# Altium PCB Copy of PCB_FinalResult.PcbDoc
Units mm, origin at the board's own origin, x right, y up, seen from the top; angles counter-clockwise.
Board outline 96.14 x 51.12 mm, 2 copper layers (Top Layer, Bottom Layer); 61 components, 39 nets, 231 pads, 106 vias.
Unrouted connection lines stored in the file: 1.
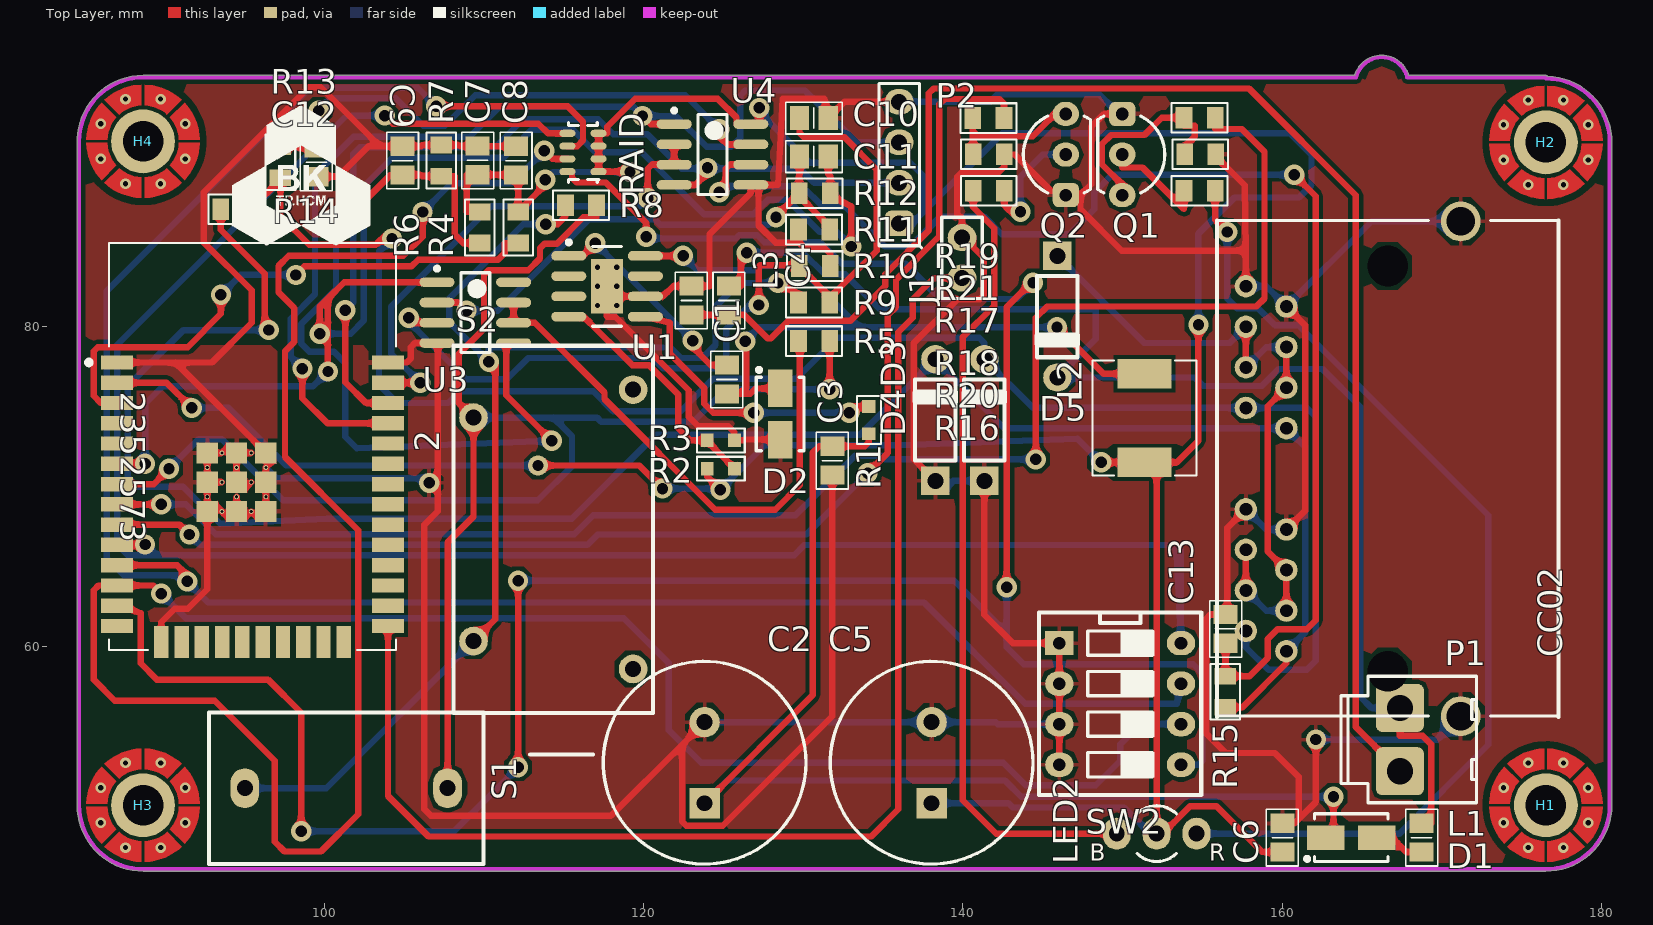
[diagram p0: Top Layer view]
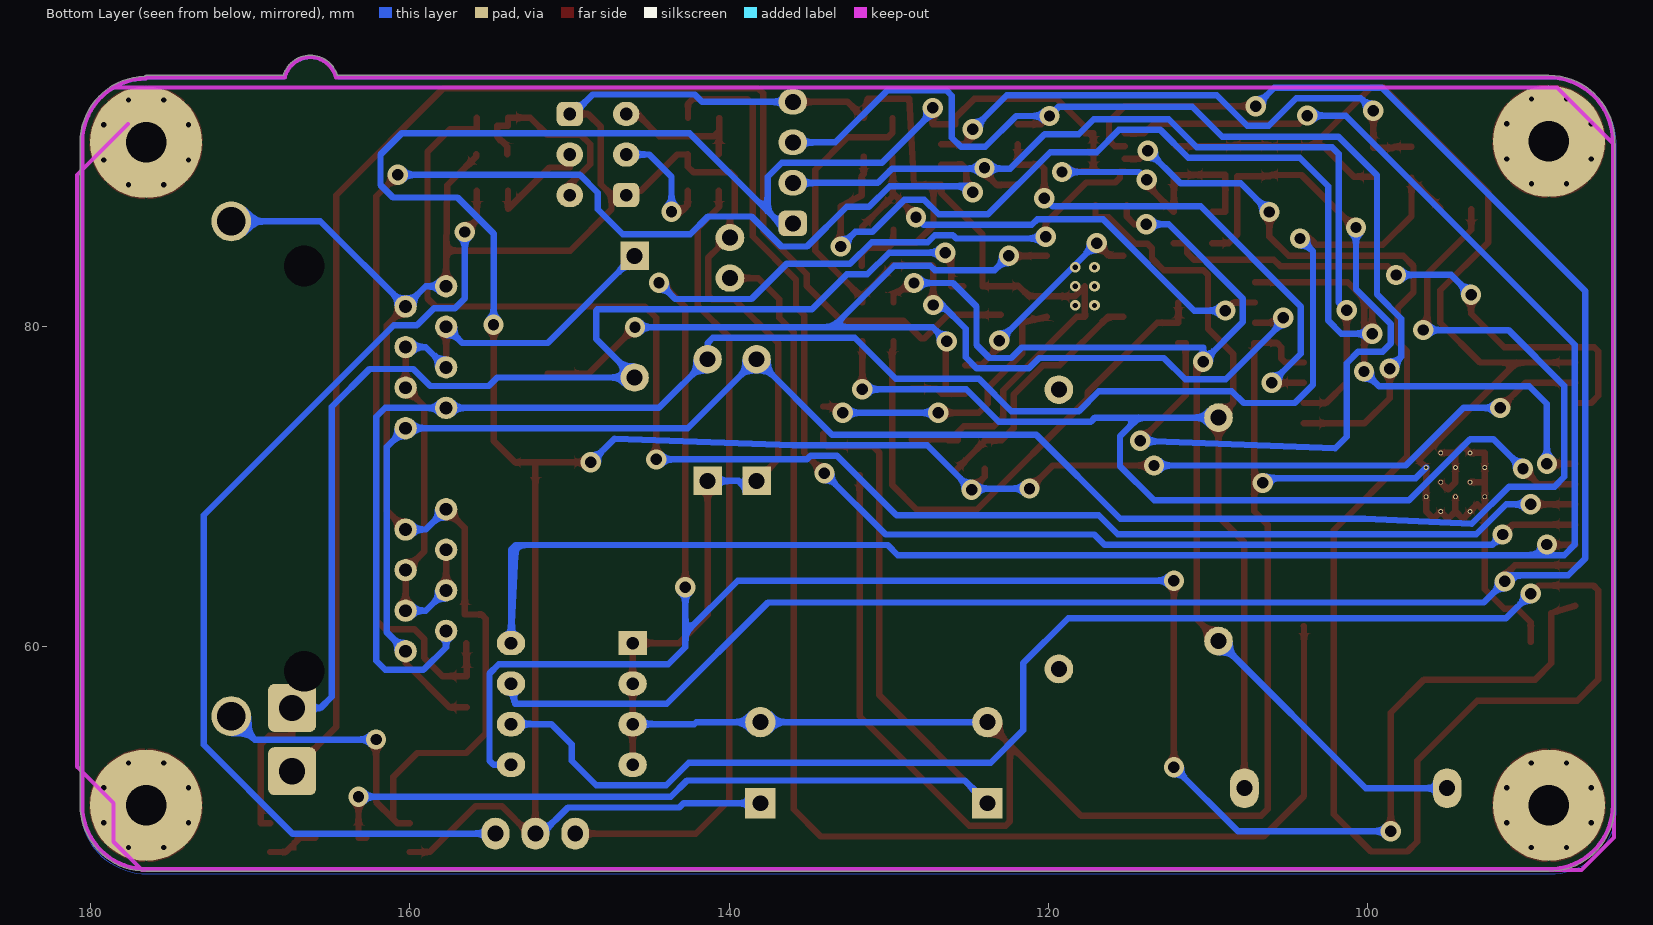
[diagram p1: Bottom Layer view, seen from below]

## Layer stack, top to bottom
Top Solder: solder mask 0.0102, Solder Resist, Dk 3.5
Top Layer: signal copper 0.0356
Dielectric 1: dielectric 0.32, FR-4, Dk 4.8
Bottom Layer: signal copper 0.0356
Bottom Solder: solder mask 0.0102, Solder Resist, Dk 3.5

## Board outline
84.519,50.033 ccw(c88.646,50.038) 88.646,45.911 176.53,45.911 ccw(c176.53,50.038) 180.657,50.038 180.657,91.567 ccw(c176.53,91.567) 176.641,95.693 ccw(c176.53,95.631) 176.53,95.758 167.941,95.758 ccw(c166.243,95.258) 164.545,95.758 88.646,95.758 ccw(c88.646,91.631) 84.522,91.79 84.519,91.762

## Design rules (kind name [scope] priority, off if disabled: settings)
Clearance Clearance_1 [InNamedPolygon('GND_L01_P000')] p1: gap=0.254 ignorepadtopadclearanceinfootprint=FALSE
Clearance [All] p2: gap=0.254 ignorepadtopadclearanceinfootprint=FALSE except(0: Arc-Hole Track-Hole SMDPad-Hole THPad-Hole Via-Hole Fill-Hole Poly-Hole Region-Hole Text-Hole)
ComponentClearance [InComponent('H*') OR InComponent('S1')] p1: gap=0 collisioncheckmode=3 verticalgap=0 showdistances=FALSE
Height [All] p1: minheight=0 maxheight=30 prefheight=12.7
MinimumSolderMaskSliver [IsText] p1: minsoldermaskwidth=0.254
PasteMaskExpansion [All] p1: expansion=0.254 thpadusetoppaste=TRUE thpadusebottompaste=TRUE
PolygonConnect [All] p1: connectstyle=Relief reliefconductorwidth=0.254 reliefentries=4 polygonreliefangle="90 Angle" airgapwidth=0.254
RoutingVias [All] p1: holewidth=0.711 width=1.27 viastyle="Through Hole" minholewidth=0.711 minwidth=1.27 maxholewidth=0.711 maxwidth=1.27
SilkToSilkClearance [IsText] p1: silktosilkclearance=0.254
SilkToSolderMaskClearance [IsText] p1: minsilkscreentomaskgap=0.254 clearancetoexposedcopper=TRUE
SolderMaskExpansion [All] p1: expansion=0.127 istentingtop=FALSE soldermaskfromhole=TRUE
UnpouredPolygon [All] p1: allowunpoured=TRUE allowshelved=TRUE
Width [All] p1: maxlimit=2 minlimit=0.2 preferedwidth=0.4 minimp=50.000000 maximp=50.000000 favimp=50.000000
23 further rules are at their usual default settings.

## Classes and differential pairs
component class "Slide Switch with an MCU": RAID SW2
component class RS-485: C12 C13 D3 D4 D5 R13 R14 R15 U4
component class "High-currenr LEDs": LED2 Q1 Q2 R16 R17 R18 R19 R20 R21
component class "ESP32_WROM_32 part": 2 C7 C8 J1 P2 R4
component class "Current sensor circuit": C9 C10 C11 R5 R6 R7 R8 R9 R10 R11 R12 S1 S2 U3
component class "3.3V regulator IC TPS5430": C1 C2 C3 C4 C5 C6 D1 D2 H2 H3 H4 L1 L2 L3 P1 R1 R2 R3 U1

## Components (designator, comment, footprint, x,y, rotation, side; value= is the part's Value field where it differs from the comment)
2 "ESP32-WROOM-32" MODULE_ESP32-WROOM-32 95.504,72.517 r0 top (schematic designator U2)
C1 "10nF" "C 0805" 125.222,76.708 r270 top
C2 "100uF/35V" CYL/D.500/LS.200 123.825,52.705 r90 top
C3 "0.1uF" "C 0805" 131.826,71.628 r270 top
C4 "1uF" "C 0805" 125.349,81.661 r270 top
C5 "220uF/16V" CYL/D.500/LS.200 138.049,52.705 r90 top
C6 "0.1uF" "C 0805" 160.02,48.006 r90 top
C7 "0.1uF" "C 0805" 109.607,90.435 r90 top
C8 "22uF" "C 0805" 112.014,90.424 r90 top
C9 "1uF" "C 0805" 104.902,90.424 r90 top
C10 "100pF" "C 0805" 130.672,93.091 r0 top
C11 "100pF" "C 0805" 130.672,90.678 r0 top
C12 "N/A" "C 0805" 99.504,90.317 r90 top
C13 "N/A" "C 0805" 156.464,61.087 r90 top
CN3 "RJ45 x2" CONN/RJ45/x2 166.624,71.12 r90 top
D1 "SS34" "DO-214AC (SMA)" 164.338,48.006 r180 top
D2 "SS34" "DO-214AC (SMA)" 128.558,74.549 r90 top
D3 "" DO-41 141.351,70.358 r90 top
D4 "" DO-41 138.282,70.358 r90 top
D5 "SS14" DO-41 145.923,84.455 r270 top
H1 "Screw Hole" SCREW/3.2/7.0/M 176.53,50.038 r0 top
H2 "Screw Hole" SCREW/3.2/7.0/M 176.53,91.567 r0 top
H3 "Screw Hole" SCREW/3.2/7.0/M 88.646,50.038 r0 top
H4 "Screw Hole" SCREW/3.2/7.0/M 88.646,91.631 r0 top
J1 "JUMP 2" JUMP/2/Close 139.954,85.598 r270 top
L1 "FB" "L 0805 (2012)" 168.742,48.006 r270 top
L2 "15uH" IND_SRP6540-150M 151.384,74.295 r270 top
L3 "FB" "L 0805 (2012)" 122.995,81.661 r90 top
LED2 "RB LED" LED-BICOLOR-3MM 154.646,48.26 r270 top
P1 "Header 2" HDR/Header/2/VH 167.386,54.154 r270 top
P2 "Header 4" HDR/Header/4 136.017,90.297 r90 top
Q1 "MMBT3904LT1G" TO-92/W100 149.99,90.805 r270 top
Q2 "MMBT3904LT1G" TO-92/W100 146.459,90.805 r90 top
R1 "N/A" "R 0603" 134.112,74.168 r90 top
R2 "10.0k" "R 0603" 124.841,71.12 r180 top
R3 "5.9k" "R 0603" 124.841,72.898 r180 top
R4 "10k" "R 0805" 112.141,86.233 r90 top
R5 "1k" "R 0805" 130.683,79.121 r0 top
R6 "1k" "R 0805" 109.735,86.233 r90 top
R7 "1k" "R 0805" 107.315,90.424 r270 top
R8 "100" "R 0805" 116.078,87.63 r0 top
R9 "1k" "R 0805" 130.683,81.534 r180 top
R10 "1k" "R 0805" 130.724,83.82 r180 top
R11 "1k" "R 0805" 130.683,86.106 r0 top
R12 "1k" "R 0805" 130.724,88.392 r0 top
R13 "10" "R 0805" 97.255,90.318 r270 top
R14 "120" "R 0805" 94.488,87.376 r0 top
R15 "10" "R 0805" 156.446,57.15 r270 top
R16 "330" "R 0805" 154.834,88.54 r0 top
R17 "330" "R 0805" 141.626,88.54 r180 top
R18 "4.7k" "R 0805" 154.834,93.112 r0 top
R19 "4.7k" "R 0805" 141.605,93.091 r0 top
R20 "47k" "R 0805" 154.875,90.826 r180 top
R21 "47k" "R 0805" 141.626,90.826 r180 top
RAID "10k" "RA4 1206 (3216)" 116.205,90.932 r180 top
S1 "TA12" TA12 101.373,51.105 r180 top
S2 "TA17" TA17 114.347,67.325 r270 top
SW2 "SW DIP-4" SW/DIP4 146.05,60.198 r270 top
U1 "TPS5430" "SOIC-8 EP" 117.716,82.55 r0 top
U3 "LM358" SOIC-8 109.461,80.899 r0 top
U4 "MAX485" SOIC-8 124.32,90.805 r0 top

## Footprints (in the part's own frame and the unit in brackets; to place one, negate y for a bottom-side part, rotate by r counter-clockwise, add the part's x,y. Pads: shape width x height; smd on the part's side, far side on the other; paste and mask are expansions set on the pad)
"C 0805" [mm] "Chip Capacitor, 2-Leads, Body 2.0x1.3mm, IPC Medium Density"
  rect 1.2x1.5 smd: 1(-0.9,0) 2(0.9,0)
  silkscreen extent -1.78,-1 1.78,1, body extent -1,-0.64 1,0.61, height 0.6
CONN/RJ45/x2 [mm]
  round 1.4 hole 0.8: 1(-11.43,6.35) 2(-10.16,8.89) 3(-8.89,6.35) 4(-7.62,8.89) 5(-6.35,6.35) 6(-5.08,8.89) 7(-3.81,6.35) 8(-2.54,8.89) 11(2.54,6.35) 12(3.81,8.89) 13(5.08,6.35) 14(6.35,8.89) 15(7.62,6.35) 16(8.89,8.89) 17(10.16,6.35) 18(11.43,8.89)
  round 2.5 hole 1.8: 9(-15.5,-4.57) 10(15.5,-4.57)
  round 0 hole 2.54 unplated: HOLE(-12.7,0) HOLE(12.7,0)
  silkscreen extent -15.56,-10.7 15.56,10.7, body extent -15.5,-10.7 15.56,10.7, height 13.46
CYL/D.500/LS.200 [mil]
  rect 75x75 hole 39: 1(-100,0)
  round 75 hole 39: 2(100,0)
  silkscreen extent -250,-250 250,250, body extent -256,-255 254,255, height 866
DO-41 [mil]
  rect 70x70 hole 39.37: 1(0,0)
  round 70 hole 39.37: 2(300,0)
  silkscreen extent 50,-55 250,55, body extent -15,-47 315,47, height 99
"DO-214AC (SMA)" [mm] "Molded Diode, 2-Leads, Body 4.3x2.7mm, IPC Medium Density"
  rect 2.35x1.55 smd: 1(-1.6,0) 2(1.6,0)
  silkscreen extent -2.3,-1.5 2.89,1.5, body extent -2.6,-1.3 2.6,1.3, height 2.4
HDR/Header/2/VH [mm]
  rrect25% 3x3 hole 1.65: 1(-1.98,0) 2(1.98,0)
  silkscreen extent -3.96,-3.7 3.96,4.8, body extent -3.93,-3.7 3.93,4.8, height 10.6
HDR/Header/4 [mm]
  rrect50% 1.6x1.8 hole 1: 1(-3.81,0)
  oval 1.6x1.8 hole 1: 2(-1.27,0) 3(1.27,0) 4(3.81,0)
  silkscreen extent -5.33,-1.4 4.95,1.27, body extent -5.08,-1.27 5.08,1.27, height 8.89
IND_SRP6540-150M [mm]
  rect 1.85x3.4 smd: 1(-2.775,0) 2(2.775,0)
  silkscreen extent -3.6,-3.25 3.6,3.25
JUMP/2/Close [mm]
  oval 1.7x1.8 hole 1: 1(0,0) 2(2.54,0)
  silkscreen extent -1.27,-1.27 3.81,1.27, body extent -1.27,-1.27 3.81,1.27, height 8.89
"L 0805 (2012)" [mm] "Chip Capacitor, 2-Leads, Body 2.0x1.3mm, IPC Medium Density"
  rect 1.2x1.5 smd: 1(-0.9,0) 2(0.9,0)
  silkscreen extent -1.78,-1 1.78,1, body extent -1,-0.6 1,0.6, height 0.95
LED-BICOLOR-3MM [mm] "Diode, Axial; Body 5.2 x 2.7 mm (LxDia. max), Lead Dia. 0.86 mm (max)"
  oval 2x1.75 hole 1: 1(0,0) 2(0,-2.5) 3(0,-5)
  silkscreen extent -1.75,-3.74 1.75,-1.26, body extent -2.02,-5.29 2.02,0.29, height 6.76
MODULE_ESP32-WROOM-32 [mm]
  rect 2x0.9 smd: 1(-8.5,5.26) 2(-8.5,3.99) 3(-8.5,2.72) 4(-8.5,1.45) 5(-8.5,0.18) 6(-8.5,-1.09) 7(-8.5,-2.36) 8(-8.5,-3.63) 9(-8.5,-4.9) 10(-8.5,-6.17) 11(-8.5,-7.44) 12(-8.5,-8.71) 13(-8.5,-9.98) 14(-8.5,-11.25) 25(8.5,-11.25) 26(8.5,-9.98) 27(8.5,-8.71) 28(8.5,-7.44) 29(8.5,-6.17) 30(8.5,-4.9) 31(8.5,-3.63) 32(8.5,-2.36) 33(8.5,-1.09) 34(8.5,0.18) 35(8.5,1.45) 36(8.5,2.72) 37(8.5,3.99) 38(8.5,5.26)
  rect 0.9x2 smd: 15(-5.715,-12.25) 16(-4.445,-12.25) 17(-3.175,-12.25) 18(-1.905,-12.25) 19(-0.635,-12.25) 20(0.635,-12.25) 21(1.905,-12.25) 22(3.175,-12.25) 23(4.445,-12.25) 24(5.715,-12.25)
  rect 1.33x1.33 smd: 39(-2.835,-4.075) 39(-2.835,-2.24) 39(-2.835,-0.405) 39(-1,-4.075) 39(-1,-2.24) 39(-1,-0.405) 39(0.835,-4.075) 39(0.835,-2.24) 39(0.835,-0.405)
  round 0.3 hole 0.2: 39(-2.835,-3.158) 39(-2.835,-1.323) 39(-1.917,-4.075) 39(-1.917,-2.24) 39(-1.917,-0.405) 39(-1,-3.158) 39(-1,-1.323) 39(-0.082,-4.075) 39(-0.082,-2.24) 39(-0.082,-0.405) 39(0.835,-3.158) 39(0.835,-1.323)
  Top Layer pour cut-out: -9.017,12.827 -9.017,6.35 9.017,6.35 9.017,12.827
  Bottom Layer pour cut-out: -9.017,12.827 -9.017,6.35 9.017,6.35 9.017,12.827
  silkscreen extent -10.4,-12.75 9,12.75, body extent -9,-12.75 9,12.75, height 2.91
"R 0603" [mm] "Chip Resistor, 2-Leads, Body 1.6x0.8mm, IPC Medium Density"
  rect 0.8x0.85 smd: 1(-0.85,0) 2(0.85,0)
  silkscreen extent -1.5,-0.75 1.5,0.75, body extent -0.8,-0.4 0.8,0.4, height 0.5
"R 0805" [mm] "Chip Resistor, 2-Leads, Body 2.0x1.3mm, IPC Medium Density"
  rect 1.05x1.35 smd: 1(-0.975,0) 2(0.975,0)
  silkscreen extent -1.75,-0.93 1.75,0.93, body extent -1,-0.61 1,0.59, height 0.5
"RA4 1206 (3216)" [mm] "Resistor Array x4 1206 (4D03)"
  oval 1x0.45 smd: 1(-0.975,1.2) 2(-0.975,0.4) 3(-0.975,-0.4) 4(-0.975,-1.2) 5(0.975,-1.2) 6(0.975,-0.4) 7(0.975,0.4) 8(0.975,1.2)
  silkscreen extent -0.99,-1.87 0.9,1.87, body extent -0.8,-1.6 0.8,1.6, height 0.5
SCREW/3.2/7.0/M [mm]
  round 4 / inner round 7 / far side round 7 hole 2.54: 1(0,0)
  Top Layer region: -2.25,0.1 -2.225,0.325 -2.175,0.575 -2.1,0.8 -2.025,0.975 -1.95,1.125 -1.875,1.25 -1.775,1.375 -1.675,1.5 -2.6,2.425 -2.775,2.225 -2.925,2.025 -3.05,1.825 -3.175,1.6 -3.275,1.375 -3.35,1.175 -3.425,0.95 -3.475,0.725 -3.5,0.6 -3.525,0.45 -3.55,0.1
  Top Layer region: -2.25,-0.1 -2.225,-0.325 -2.175,-0.575 -2.1,-0.8 -2.025,-0.975 -1.95,-1.125 -1.875,-1.25 -1.775,-1.375 -1.675,-1.5 -2.6,-2.425 -2.775,-2.225 -2.925,-2.025 -3.05,-1.825 -3.175,-1.6 -3.275,-1.375 -3.35,-1.175 -3.425,-0.95 -3.475,-0.725 -3.5,-0.6 -3.525,-0.45 -3.55,-0.1
  Top Layer region: -0.1,2.25 -0.325,2.225 -0.575,2.175 -0.8,2.1 -0.975,2.025 -1.125,1.95 -1.25,1.875 -1.375,1.775 -1.5,1.675 -2.425,2.6 -2.225,2.775 -2.025,2.925 -1.825,3.05 -1.6,3.175 -1.375,3.275 -1.175,3.35 -0.95,3.425 -0.725,3.475 -0.6,3.5 -0.45,3.525 -0.1,3.55
  Top Layer region: 0.1,2.25 0.325,2.225 0.575,2.175 0.8,2.1 0.975,2.025 1.125,1.95 1.25,1.875 1.375,1.775 1.5,1.675 2.425,2.6 2.225,2.775 2.025,2.925 1.825,3.05 1.6,3.175 1.375,3.275 1.175,3.35 0.95,3.425 0.725,3.475 0.6,3.5 0.45,3.525 0.1,3.55
  Top Layer region: 2.25,-0.1 2.225,-0.325 2.175,-0.575 2.1,-0.8 2.025,-0.975 1.95,-1.125 1.875,-1.25 1.775,-1.375 1.675,-1.5 2.6,-2.425 2.775,-2.225 2.925,-2.025 3.05,-1.825 3.175,-1.6 3.275,-1.375 3.35,-1.175 3.425,-0.95 3.475,-0.725 3.5,-0.6 3.525,-0.45 3.55,-0.1
  Top Layer region: 2.25,0.1 2.225,0.325 2.175,0.575 2.1,0.8 2.025,0.975 1.95,1.125 1.875,1.25 1.775,1.375 1.675,1.5 2.6,2.425 2.775,2.225 2.925,2.025 3.05,1.825 3.175,1.6 3.275,1.375 3.35,1.175 3.425,0.95 3.475,0.725 3.5,0.6 3.525,0.45 3.55,0.1
  Top Layer region: 0.1,-2.25 0.325,-2.225 0.575,-2.175 0.8,-2.1 0.975,-2.025 1.125,-1.95 1.25,-1.875 1.375,-1.775 1.5,-1.675 2.425,-2.6 2.225,-2.775 2.025,-2.925 1.825,-3.05 1.6,-3.175 1.375,-3.275 1.175,-3.35 0.95,-3.425 0.725,-3.475 0.6,-3.5 0.45,-3.525 0.1,-3.55
  Top Layer region: -0.1,-2.25 -0.325,-2.225 -0.575,-2.175 -0.8,-2.1 -0.975,-2.025 -1.125,-1.95 -1.25,-1.875 -1.375,-1.775 -1.5,-1.675 -2.425,-2.6 -2.225,-2.775 -2.025,-2.925 -1.825,-3.05 -1.6,-3.175 -1.375,-3.275 -1.175,-3.35 -0.95,-3.425 -0.725,-3.475 -0.6,-3.5 -0.45,-3.525 -0.1,-3.55
  Top Layer pour cut-out: -4,0 -3.696,1.531 -2.828,2.828 -1.531,3.695 0,4 0,4 1.531,3.695 2.828,2.828 3.695,1.531 4,0 4,0 3.696,-1.531 2.828,-2.828 1.531,-3.696 0,-4 0,-4 -1.531,-3.696 -2.828,-2.828 -3.696,-1.531 -4,0
  Bottom Layer pour cut-out: -4,0 -3.696,1.531 -2.828,2.828 -1.531,3.695 0,4 0,4 1.531,3.695 2.828,2.828 3.695,1.531 4,0 4,0 3.696,-1.531 2.828,-2.828 1.531,-3.696 0,-4 0,-4 -1.531,-3.696 -2.828,-2.828 -3.696,-1.531 -4,0
SOIC-8 [mm] "SOIC, 8-Leads, Body 5.0x4.0mm (max), Pitch 1.27mm, IPC Medium Density"
  oval 2.2x0.6 smd: 1(-2.4,1.905) 2(-2.4,0.635) 3(-2.4,-0.635) 4(-2.4,-1.905) 5(2.4,-1.905) 6(2.4,-0.635) 7(2.4,0.635) 8(2.4,1.905)
  silkscreen extent -2.52,-2.5 0.9,2.88, body extent -3,-2.49 3,2.41, height 1.75
"SOIC-8 EP" [mm] "SOIC, 8-Leads, Body 5.0x4.0mm (max), Pitch 1.27mm, IPC Medium Density"
  oval 2.2x0.6 smd: 1(-2.4,1.905) 2(-2.4,0.635) 3(-2.4,-0.635) 4(-2.4,-1.905) 5(2.4,-1.905) 6(2.4,-0.635) 7(2.4,0.635) 8(2.4,1.905)
  rect 2x3.4 smd: 9(0,0)
  silkscreen extent -2.52,-2.5 0.9,2.88, body extent -3,-2.49 3,2.41, height 1.75
SW/DIP4 [mil]
  rect 60x70 hole 31: 1(0,0)
  oval 60x70 hole 31: 2(100,0) 3(200,0) 4(300,0) 5(300,300) 6(200,300) 7(100,300) 8(0,300)
  silkscreen extent -75,-50 375,350, body extent -50,0 350,300, height 165
TA12 [mm]
  oval 1.8x2.5 hole 1: 1(-6.35,0) 2(6.35,0)
  silkscreen extent -8.6,-4.75 8.6,4.75, body extent -8.6,-4.75 8.6,4.75, height 20.4
TA17 [mm]
  round 1.8 hole 1: 1(-7,-5) 2(7,-5) 3(8.75,5) 4(-8.75,5)
  silkscreen extent -11.5,-6.25 11.5,6.25, body extent -11.5,-6.25 11.5,6.25, height 26
TO-92/W100 [mil]
  rrect50% 60x65 hole 31: 1(-100,0)
  oval 60x65 hole 31: 2(0,0) 3(100,0)
  silkscreen extent -95,-60 95,105, body extent -114,-60 112,105, height 370

## Part data
2: "Bluetooth, WiFi 802.11b/g/n, Bluetooth v4.2 + EDR, Class 1, 2 and 3 Transceiver Module 2.4GHz ~ 2.5GHz Integrated, Trace Surface Mount", PACKAGE="Module Espressif Systems", Availability=Unavailable, MF="Espressif Systems", MP=ESP32-WROOM-32D, Price=None, SnapEDA_Link=https://www.snapeda.com/parts/ESP32-WROOM-32D/Espressif%20Systems/view-part/2768115/?ref=snap
C1 C3 C4 C6 C7 C8 C9 C10 C11 C12 C13: library part "Capacitor NP", "Capacitor non-pol"
C2 C5: library part Capacitor, "Capacitor pol"
CN3: library part "CON RJ45 x2", "Connector RJ45 X2"
D1 D5: library part Diode, "Default Diode"
D2 D3 D4: library part "Diode Zener", "Zener Diode"
L1 L3: library part Inductor, "Inductor"
L2: library part SRP6540-150M, "15ÂµH Shielded Wirewound Inductor 2.9A 121mOhm Max Nonstandard", PACKAGE="Nonstandard Bourns", Check_prices=https://www.snapeda.com/parts/SRP6540-150M/Bourns/view-part/613418/?ref=eda, Digi-Key_Part_Number=SRP6540-150MCT-ND, MF=Bourns, MP=SRP6540-150M, Purchase-URL=https://pricing.snapeda.com/search/part/SRP6540-150M/?ref=eda, SnapEDA_Link=https://www.snapeda.com/parts/SRP6540-150M/Bourns/view-part/613418/?ref=snap
LED2: library part "LED 2-color-A", "Bicolor RB 3mm LED"
P1: "Header, 2-Pin"
P2: "Header, 4-Pin"
Q1 Q2: library part "Transistor NPN", "NPN Bipolar Transistor"
R1 R2 R3 R4 R5 R6 R7 R8 R9 R10 R11 R12 R13 R14 R15 R16 R17 R18 R19 R20 R21: library part Resistor, "Resistor"
RAID: library part "Resistor Array 4", "Resistor Array 4"
U1: library part TPS54xx, "3/5A, Wide input range, Step-down SWIFT DC-DC Converter"
U3: "Low Power Dual Operational Amplifiers"
U4: "Low-Power, Slew-Rate-Limited  RS-485/RS-422 Transceivers"
H1 H2 H3 H4: TYPE=NO-BOM, UNIT PRICE=0

## Via types
v1: diameter 1.27, hole 0.711, Top Layer to Bottom Layer, 68 vias
v2: diameter 0.66, hole 0.33, Top Layer to Bottom Layer, 38 vias

## Nets (pads, with @x,y where several pads share a name; then routed paths per layer and width w, separated by ;. In a path a pad name is that pad's centre, name@x,y a point inside that pad or via, vN(x,y) a via of type N, cw(c..) or ccw(c..) an arc to the next point about the centre after c; other vN are vias at no path point)
3V3: 2.2 C5.1 C6.1 C7.1 C8.1 L2.2 LED2.2 P2.1 R2.2 R4.2 R6.2 RAID.1 RAID.2 RAID.3 RAID.4 U4.8 | length 223.2
  Top Layer w0.4: 2.2 90.117,76.507 v1(91.694,74.93) ; R6.2 108.915,87.208 108.915,89.535 C7.1 110.795,89.535 110.806,89.524 C8.1 112.141,89.524 R4.2 113.843,88.91 v1(113.843,89.23) ; v1(113.386,71.323) 119.736,71.323 v1(121.183,69.875) ; v1(119.151,89.713) 119.132,89.732 RAID.1 RAID.2 RAID.3 RAID.4 117.716,92.132 117.716,92.545 119.478,94.307 124.638,94.307 125.82,93.125 125.82,92.71 U4.8 127.254,92.71 v1(127.254,93.726) ; R2.2 123.991,70.624 124.739,69.875 v1(124.816,69.799) ; v1(148.666,71.52) L2.2 L2.2@152.146,71.52 ; v1(154.762,80.137) 154.762,72.866 153.416,71.52 L2.2@152.146,71.52 ; C6.1 158.761,47.106 155.88,49.987 154.254,49.987 152.527,48.26 LED2.2 L2.2@152.146,71.52
  Bottom Layer w0.4: v1(91.694,74.93) 94,74.93 97.607,71.323 v1(113.386,71.323) ; v1(113.843,89.23) 114.325,89.713 v1(119.151,89.713) ; v1(121.183,69.875) v1@124.739,69.875 ; v1(124.816,69.799) 127.6,72.584 135.984,72.584 147.187,73 v1(148.666,71.52) ; v1(127.254,93.726) 127.254,93.472 130.429,90.297 136.703,90.297 137.592,89.408 137.592,87.249 ; P2.1 136.83,86.487 137.592,87.249 ; C5.1 142.862,50.165 143.129,49.898 150.101,49.898 151.74,48.26 LED2.2 ; v1(154.762,80.137) 154.762,85.852 157.023,88.113 161.061,88.113 161.849,88.9 161.849,90.805 160.528,92.126 142.469,92.126 137.592,87.249
"ADC1 CH6": 2.6 C11.2 R12.2 U3.1 | length 85.9
  Top Layer w0.4: 2.6 v1(88.773,71.427) ; v1(99.72,79.578) 99.72,81.28 100.228,81.788 ; v1(100.228,77.216) 100.228,81.788 ; U3.1 101.244,82.804 100.228,81.788 ; C11.2 131.572,89.586 131.699,89.459 R12.2 131.699,88.24 133.02,87.554 v1(133.02,85.039)
  Bottom Layer w0.4: v1(88.773,71.427) 88.773,75.184 89.872,76.283 99.295,76.283 v1(100.228,77.216) ; v1(99.72,79.578) 101.648,79.578 102.479,80.41 102.479,88.817 104.264,90.602 111.243,90.602 112.986,92.345 115.586,92.345 116.976,90.954 119.888,90.954 123.787,87.055 126.882,87.055 127.787,87.96 129.032,87.96 131.026,85.966 132.093,85.966 v1(133.02,85.039)
"ADC1 CH7": 2.7 R5.2 R8.2 S1.1 S2.1 | length 105.5
  Top Layer w0.4: 2.7 89.309,70.157 v1(90.272,71.12) ; S1.1 107.723,66.499 109.347,68.123 S2.1 108.433,75.239 108.433,78.308 110.007,79.883 110.007,83.279 110.287,83.558 112.776,83.558 113.513,84.295 113.513,84.938 113.792,85.217 114.579,85.217 116.23,86.868 117.053,86.868 R8.2 ; v1(131.658,76.095) R5.2
  Bottom Layer w0.4: v1(90.272,71.12) 92.118,72.966 93.587,72.966 97.411,69.142 113.376,69.142 115.515,71.28 115.515,73.152 114.342,74.325 ; S2.1 114.342,74.325 ; v1(131.658,76.095) 125.148,76.095 123.12,74.067 117.339,74.067 117.081,74.325 114.342,74.325
GND: 2.1 2.15 2.38 2.39 C2.2 C3.2 C5.2 C6.2 C7.2 C8.2 C9.2 C10.2 C12.1 C13.2 CN3.7 CN3.8 CN3.9 CN3.10 CN3.17 CN3.18 D2.1 D3.1 D4.1 J1.1 L3.2 P2.4 Q1.1 Q2.1 R3.1 R7.1 R10.1 R11.1 R20.1 R21.1 SW2.1 SW2.2 SW2.3 SW2.4 U1.6 U1.9 U3.4 U4.5 | length 440.4
  Top Layer w0.4: 2.1 90.674,77.777 ; 2.15 89.789,61.493 90.637,62.341 91.44,62.341 92.669,63.57 2.39@92.669,68.442 ; 2.39@93.587,70.277 2.39@92.669,70.277 ; 2.39@94.504,69.359 2.39@94.504,68.442 ; 2.39@95.422,70.277 94.963,69.818 94.504,70.277 94.504,71.194 2.39@94.504,72.112 ; 2.39@95.422,72.112 2.39@94.504,72.112 ; C12.1 100.861,89.417 102.768,91.324 103.48,91.324 ; 2.38 105.156,77.777 105.406,78.027 105.406,78.74 105.66,78.994 U3.4 107.112,78.994 107.112,70.764 ; v1(106.578,70.231) 107.112,70.764 ; C8.2 110.385,91.324 110.374,91.335 C7.2 108.471,91.335 108.407,91.399 R7.1 106.145,91.399 106.07,91.324 C9.2 103.48,91.324 ; C2.2 122.419,53.839 ; D2.1 126.335,72.949 126.284,72.898 R3.1 125.691,73.406 125.31,73.787 123.419,73.787 122.839,74.366 122.839,76.028 118.222,80.645 117.716,80.645 U1.9 118.351,81.915 U1.6 121.209,81.915 121.855,82.561 L3.2 124.13,82.561 124.13,85.802 126.72,88.392 U4.5 U4.5@127.205,88.9 ; R10.1 131.699,84.582 131.318,84.963 130.048,84.963 129.724,85.287 ; C3.2 131.826,55.617 124.968,48.759 122.682,48.759 122.419,49.022 122.419,53.839 ; P2.4 132.588,94.107 C10.2 131.318,94.31 128.718,94.31 128.422,88.9 U4.5@127.205,88.9 ; D4.1 136.931,71.708 136.931,78.994 139.675,81.737 141.072,81.737 141.308,81.974 141.308,84.353 140.665,84.996 140.665,85.598 J1.1 139.954,86.792 139.649,87.097 139.649,89.408 139.929,89.687 142.24,89.687 142.6,90.048 R21.1@142.6,90.805 ; D3.1 141.351,61.976 143.129,60.198 SW2.1 SW2.2 SW2.3 SW2.4 ; R21.1 R21.1@142.6,90.805 ; Q1.1 148.844,93.345 148.056,92.557 148.056,88.951 147.371,88.265 ; R20.1 155.85,90.678 157.655,88.873 157.734,84.785 ; CN3.8 156.566,67.412 156.566,61.987 C13.2 155.51,61.987 155.245,61.722 155.245,54.534 156.464,53.315 159.537,53.315 161.036,51.816 161.036,49.16 ; CN3.18 157.734,84.785 ; C6.2 160.782,48.906 161.036,49.16 ; CN3.7 161.442,68.478 161.442,80.112 CN3.17 ; v1(162.122,54.153) 162.122,50.246 161.036,49.16 ; 90.674,77.777 96.339,72.112 96.798,71.653 96.339,71.194 96.339,70.277 96.339,69.359 96.339,68.442 95.88,67.983 95.422,68.442 94.963,67.983 2.39@94.504,68.442 ; 90.674,77.777 92.966,77.777 95.453,80.264 95.453,82.296 92.456,85.293 92.456,88.443 99.035,95.021 99.782,95.021 103.48,91.324 ; 2.39@92.669,68.442 92.669,69.359 2.39@92.669,70.277 ; 2.39@92.669,68.442 93.128,68.901 93.587,68.442 94.045,67.983 2.39@94.504,68.442 ; 2.39@92.669,70.277 92.669,71.194 92.669,72.112 93.587,72.112 94.045,72.571 2.39@94.504,72.112 ; 107.112,70.764 107.112,68.453 106.274,67.615 106.274,49.784 106.68,49.378 117.958,49.378 122.419,53.839 ; U4.5@127.205,88.9 127.205,86.36 128.294,85.271 129.708,85.271 129.724,85.287 ; 129.724,85.287 R11.1 129.708,85.303 129.724,85.287 ; R21.1@142.6,90.805 143.256,90.805 145.542,88.519 Q2.1 147.371,88.265 ; 147.371,88.265 147.371,87.376 149.962,84.785 157.734,84.785
  Bottom Layer w0.4: 2.39@96.339,71.194 96.998,70.536 106.274,70.536 v1(106.578,70.231) ; C2.2 C5.2 142.062,55.245 142.189,55.118 SW2.3 ; P2.4 141.707,94.107 142.164,94.564 148.539,94.564 149.758,93.345 Q1.1 ; D4.1 138.848,69.792 139.414,70.358 D3.1 ; CN3.8 159.004,67.31 CN3.7 ; CN3.18 159.004,82.55 CN3.17 165.614,86.62 CN3.10 ; v1(162.122,54.153) 169.727,54.153 CN3.9
  other v2: 117.116,81.35 118.316,81.35 117.116,82.55 118.316,82.55 117.116,83.75 118.316,83.75
LED0: 2.8 R18.2 | length 97.8
  Top Layer w0.4: 2.8 v1(89.787,68.887) ; v1(144.577,71.704) 144.577,80.569 145.288,81.28 158.394,81.28 158.902,81.788 158.902,90.983 157.48,92.405 155.809,92.405 R18.2
  Bottom Layer w0.4: v1(89.787,68.887) 91.326,68.887 93.201,67.012 115.653,67.012 116.84,68.199 129.515,68.199 133.245,71.93 134.903,71.93 135.128,71.704 v1(144.577,71.704)
LED1: 2.9 R19.2 | length 79.6
  Top Layer w0.4: 2.9 90.932,67.617 v1(91.549,67) ; v1(134.036,70.841) 135.306,72.111 135.306,80.747 135.814,81.255 135.814,82.956 138.532,85.674 138.532,93.955 138.862,94.285 142.275,94.285 142.58,93.98 R19.2
  Bottom Layer w0.4: v1(91.549,67) 92.191,66.358 116.49,66.358 117.132,67 130.195,67 v1(134.036,70.841)
NetC1_1: C1.1 U1.1 | length 13.6
  Top Layer w0.4: U1.1 116.18,84.455 v1(116.98,85.255) ; v1(123.088,79.146) 123.088,78.74 124.22,77.608 C1.1
  Bottom Layer w0.4: v1(116.98,85.255) v1(123.088,79.146)
NetC1_2: C1.2 D2.2 L2.1 U1.8 | length 49
  Top Layer w0.4: U1.8 v1(122.479,84.455) ; C1.2 126.049,75.808 ; v1(126.365,79.096) 126.441,79.019 126.441,76.2 126.049,75.808 ; D2.2 127.036,76.149 126.695,75.808 126.049,75.808 ; v1(145.898,79.985) 148.812,77.07 L2.1
  Bottom Layer w0.4: v1(122.479,84.455) 123.368,83.566 127.127,83.566 127.406,83.845 129.659,83.845 133.52,79.985 ; v1(126.365,79.096) 127.254,79.985 133.52,79.985 ; v1(145.898,79.985) 133.52,79.985
NetC9_1: C9.1 R6.1 R7.2 U3.5 | length 51.3
  Top Layer w0.4: v1(100.736,86.233) 100.852,86.233 104.143,89.524 C9.1 106.07,89.524 106.145,89.449 R7.2 108.179,89.449 108.179,85.791 108.712,85.258 R6.1 ; U3.5 111.401,78.994 111.401,75.721 v1(114.249,72.873)
  Bottom Layer w0.4: v1(100.736,86.233) 100.736,82.372 98.552,80.188 98.552,78.969 99.06,78.461 100.584,78.461 101.317,77.727 101.317,73.13 102.035,72.412 114.249,72.869 v1(114.249,72.873)
NetC10_1: C10.1 R9.1 R10.2 U3.3 | length 53.6
  Top Layer w0.4: v1(105.283,80.586) 105.605,80.264 U3.3 ; v1(127.223,81.382) 127.223,83.786 127.296,83.859 129.749,83.859 R10.2 R9.1@131.707,81.862 ; C10.1 129.772,92.163 130.048,91.887 132.588,91.887 134.617,89.858 134.617,84.772 R9.1@131.707,81.862 ; R9.1@131.707,81.862 R9.1 131.658,81.813 R9.1@131.707,81.862
  Bottom Layer w0.4: v1(105.283,80.586) 105.156,80.459 108.899,76.716 111.435,76.716 112.776,78.057 120.583,78.057 121.237,77.403 124.482,77.403 125.185,78.106 125.185,79.895 126.672,81.382 v1(127.223,81.382)
NetC11_1: C11.1 R11.2 R12.1 U3.2 | length 31.6
  Top Layer w0.4: U3.2 108.407,81.534 v1(108.915,81.026) ; v1(128.295,86.868) 128.295,86.938 R12.1 ; C11.1 129.772,89.533 129.749,89.51 R12.1 ; R11.2 131.658,86.284 129.749,88.193 R12.1
  Bottom Layer w0.4: v1(108.915,81.026) 110.865,81.026 116.577,86.738 120.71,86.738 121.046,86.401 127.829,86.401 v1(128.295,86.868)
NetC12_2: C12.2 R13.1 U4.7 | length 35.2
  Top Layer w0.4: R13.1 98.323,91.292 98.399,91.217 C12.2 99.644,91.217 v1(99.644,93.548) ; v1(124.739,92.38) 124.739,91.948 125.247,91.44 U4.7
  Bottom Layer w0.4: v1(99.644,93.548) 100.428,94.332 104.473,94.332 106.201,92.605 107.549,92.605 109.453,94.509 122.61,94.509 v1(124.739,92.38)
NetC13_1: C13.1 R15.1 U4.6 | length 82.8
  Top Layer w0.4: v1(124.739,88.443) 125.146,88.849 125.146,89.916 125.4,90.17 U4.6 ; C13.1 156.464,59.149 156.446,59.131 R15.1 157.963,58.125 159.106,59.268 159.106,60.452 159.715,61.062 161.544,61.062 162.103,61.62 162.103,88.189 v1(160.757,89.535)
  Bottom Layer w0.4: v1(124.739,88.443) 125.12,88.824 129.946,88.824 131.242,87.528 132.639,87.528 135.128,85.039 136.728,85.039 138.608,86.919 141.326,86.919 142.443,85.801 146.66,85.801 148.234,87.376 148.234,88.417 149.352,89.535 v1(160.757,89.535)
NetD1_1: D1.1 L1.2 | length 3.2
  Top Layer w0.4: D1.1 166.878,48.006 167.778,47.106 L1.2
NetJ1_2: 2.25 J1.2 | length 80.4
  Top Layer w0.4: 2.25 103.988,61.267 103.988,50.622 106.528,48.082 134.264,48.082 135.966,49.784 135.966,79.68 136.855,80.569 136.855,81.737 138.176,83.058 J1.2
NetLED2_1: LED2.1 R16.2 | length 64
  Top Layer w0.4: R16.2 155.809,86.711 v1(156.566,85.954)
  Bottom Layer w0.4: LED2.1 167.361,48.26 172.923,53.823 172.923,68.199 161.011,80.112 159.563,80.112 158.496,81.178 157.175,81.178 156.566,81.788 v1(156.566,85.954)
NetLED2_3: LED2.3 R17.2 | length 50.1
  Top Layer w0.4: R17.2 140.651,87.505 141.962,86.194 141.962,81.333 140.005,79.376 140.005,50.343 142.088,48.26 LED2.3
NetQ1_1: Q1.3 R18.1 R20.2 | length 12.8
  Top Layer w0.4: Q1.3 149.99,88.925 148.71,90.205 148.71,91.44 149.295,92.024 151.384,92.024 152.471,93.112 R18.1 153.859,92.609 154.533,92.609 154.533,91.934 153.9,91.301 R20.2
NetQ1_3: Q1.2 R16.1 | length 6.9
  Top Layer w0.4: Q1.2 149.99,89.992 151.257,89.992 153.859,87.39 R16.1
NetQ2_1: Q2.3 R19.1 R21.2 | length 8.8
  Top Layer w0.4: R19.1 140.63,92.298 ; R21.2 140.651,91.949 140.63,91.97 140.63,92.298 ; Q2.3 145.76,93.345 144.374,91.958 140.97,91.958 140.63,92.298
NetQ2_3: Q2.2 R17.1 | length 7.7
  Top Layer w0.4: R17.1 142.6,87.625 143.002,87.224 v1(143.612,87.224)
  Bottom Layer w0.4: v1(143.612,87.224) 143.612,89.408 145.009,90.805 Q2.2
NetR1_2: R1.2 U1.5 | length 18.3
  Top Layer w0.4: U1.5 121.641,80.264 121.641,78.34 123.8,76.181 123.8,75.184 124.358,74.625 v1(126.898,74.625) ; v1(132.893,74.625) 133.286,75.018 R1.2
  Bottom Layer w0.4: v1(126.898,74.625) v1(132.893,74.625)
NetR2_1: R2.1 R3.2 U1.4 | length 15.6
  Top Layer w0.4: U1.4 116.256,80.645 119.304,77.597 120.345,77.597 122.185,75.757 122.185,73.649 122.936,72.898 R3.2 123.991,72.845 125.691,71.145 R2.1
NetR4_1: 2.3 R4.1 | length 34.9
  Top Layer w0.4: 2.3 86.004,75.237 85.547,75.694 85.547,78.486 85.801,78.74 91.44,78.74 93.523,80.823 v1(93.523,82.017) ; v1(98.222,83.261) 98.755,83.795 105.461,83.795 105.878,84.212 110.882,84.212 111.303,84.633 111.303,85.258 R4.1
  Bottom Layer w0.4: v1(93.523,82.017) 94.767,83.261 v1(98.222,83.261)
NetR5_1: R5.1 U3.6 U3.7 | length 34
  Top Layer w0.4: U3.7 U3.6 113.182,80.264 117.551,75.895 117.551,75.489 124.485,68.555 128.245,68.555 129.794,70.104 129.794,78.552 129.708,78.638 R5.1
NetR8_1: R8.1 R9.2 S1.2 S2.2 | length 76.1
  Top Layer w0.4: S2.2 110.719,61.697 110.719,77.419 v1(110.312,77.826) ; v1(113.868,86.436) 114.62,86.436 115.103,86.919 R8.1 ; v1(128.422,82.753) 129.708,82.067 R9.2
  Bottom Layer w0.4: S1.2 100.127,51.105 S2.2 ; v1(113.868,86.436) 112.471,86.436 107.823,81.788 107.823,80.315 v1(110.312,77.826) 110.312,78.715 121.666,78.715 122.323,78.057 123.698,78.057 124.511,78.87 124.511,81.28 125.984,82.753 v1(128.422,82.753)
PGND: C4.2 L3.1 P1.2 | length 94.2
  Top Layer w0.4: L3.1 124.155,80.761 C4.2 126.295,80.761 127.78,79.277 127.965,79.277 129.08,80.391 132.964,80.391 135.138,82.564 135.138,83.312 137.871,86.046 137.871,94.634 138.176,94.939 157.932,94.939 164.617,88.254 164.617,54.943 P1.2
RS485_5V: CN3.3 CN3.4 CN3.5 CN3.6 CN3.13 CN3.14 CN3.15 CN3.16 D5.1 | length 43.2
  Top Layer w0.4: CN3.4 CN3.6 ; CN3.14 CN3.16 ; CN3.3 CN3.5 159.106,65.938 159.106,75.032 CN3.13 CN3.15
  Bottom Layer w0.4: D5.1 151.378,79 156.724,79 CN3.16 ; CN3.4 159.004,62.23 CN3.3 ; CN3.14 159.004,78.74 CN3.15
RS485_A: CN3.1 CN3.11 D4.2 R14.1 R15.2 | length 125.2
  Top Layer w0.4: R14.1 93.513,86.09 96.266,83.337 96.266,80.061 v1(96.52,79.807) ; R15.2 157.521,56.175 160.274,58.928 CN3.1
  Bottom Layer w0.4: v1(96.52,79.807) 91.18,79.807 87.681,76.308 87.681,70.612 88.29,70.002 91.135,70.002 93.472,67.666 100.178,67.987 115.503,67.987 120.754,73.238 133.541,73.238 D4.2 142.6,73.66 CN3.11 161.442,72.492 161.442,60.858 CN3.1
RS485_B: CN3.2 CN3.12 D3.2 R13.2 R14.2 | length 108.4
  Top Layer w0.4: R14.2 95.463,87.452 R13.2@97.255,89.244 ; R13.2 R13.2@97.255,89.244 ; v1(104.242,85.547) 103.631,85.547 103.226,85.142 99.06,85.142 97.255,86.947 R13.2@97.255,89.244
  Bottom Layer w0.4: v1(104.242,85.547) 103.429,84.734 103.429,76.371 104.565,75.235 107.772,75.235 108.509,75.971 116.84,75.971 118.09,74.721 122.326,74.721 124.355,76.749 129.556,76.749 132.131,79.324 141.021,79.324 141.351,78.994 D3.2 144.399,74.93 CN3.12 161.544,74.93 162.103,74.371 162.103,59.08 161.544,58.522 159.156,58.522 157.734,59.944 CN3.2
RS485_EN: 2.37 U4.2 U4.3 | length 31.3
  Top Layer w0.4: 2.37 106.017,76.507 v1(106.02,76.505) ; v1(120.258,88.065) 120.258,89.916 120.512,90.17 U4.3 U4.2
  Bottom Layer w0.4: v1(106.02,76.505) 104.191,78.334 104.191,81.28 110.465,87.554 119.747,87.554 v1(120.258,88.065)
RXD0: 2.35 P2.3 U4.1 | length 66.9
  Top Layer w0.4: v1(98.628,77.394) 98.628,75.54 100.201,73.967 2.35 ; v1(119.939,93.218) 120.447,92.71 U4.1
  Bottom Layer w0.4: v1(98.628,77.394) 97.892,78.13 97.892,80.518 99.416,82.042 99.416,89.51 101.829,91.923 109.118,91.923 110.998,93.802 119.355,93.802 v1(119.939,93.218) 122.026,93.218 123.956,91.288 125.476,91.288 126.052,91.864 126.052,94.488 126.382,94.818 130.099,94.818 133.35,91.567 P2.3
SW1: 2.10 RAID.5 SW2.8 | length 129.2
  Top Layer w0.4: 2.10 88.75,66.347 v1(88.773,66.37) ; v1(103.784,93.243) 104.292,92.735 113.411,92.735 114.014,92.132 RAID.5
  Bottom Layer w0.4: v1(88.773,66.37) 89.44,65.704 ; v1(103.784,93.243) 101.371,93.243 87.02,78.892 87.02,66.37 87.687,65.704 89.44,65.704 ; 89.44,65.704 129.432,65.704 130.073,66.345 153.365,66.345 ; 153.365,66.345 153.67,66.04 SW2.8 153.365,66.345
SW2: 2.11 RAID.6 SW2.7 | length 132.1
  Top Layer w0.4: 2.11 90.777,65.077 91.415,64.44 91.412,64.44 v1(91.412,64.061) ; v1(107.01,93.828) 115.24,93.828 116.205,92.862 116.205,91.694 115.843,91.332 RAID.6
  Bottom Layer w0.4: v1(91.412,64.061) 92.735,62.738 137.566,62.738 143.916,56.388 153.416,56.388 SW2.7 ; v1@91.412,64.44 87.427,64.44 86.36,65.507 86.36,82.245 99.101,94.986 105.851,94.986 v1(107.01,93.828)
SW3: 2.12 RAID.7 SW2.6 | length 167.7
  Top Layer w0.4: v1(89.789,63.297) 89.279,63.807 2.12 85.852,63.807 85.547,63.502 85.547,57.912 86.868,56.591 93.142,56.591 96.901,52.832 96.901,47.752 97.511,47.142 99.797,47.142 102.133,49.479 102.133,67.259 97.539,71.853 97.539,78.483 98.12,79.064 98.12,81.185 97.133,82.172 97.133,83.82 97.771,84.458 104.953,84.458 106.159,85.664 v1(106.159,87.204) ; v1(113.773,91.04) 114.281,90.532 RAID.7
  Bottom Layer w0.4: v1(89.789,63.297) 91.338,61.747 118.77,61.747 121.59,58.928 121.59,54.737 123.622,52.705 142.538,52.705 143.948,51.295 148.336,51.295 149.86,52.819 149.86,53.848 151.13,55.118 SW2.6 ; v1(106.159,87.204) 107.95,88.995 111.728,88.995 v1(113.773,91.04)
SW4: 2.13 RAID.8 SW2.5 | length 159.7
  Top Layer w0.4: 2.13 88.494,62.08 88.494,58.928 89.51,57.912 96.469,57.912 98.552,55.829 v1(98.552,48.412) ; v1(112.141,52.426) v1(112.141,64.11) ; RAID.8 115.519,89.732 115.519,89.357 115.824,89.052 117.627,89.052 120.167,86.512 v1(120.167,85.649) ; v1(142.748,63.703) 142.748,81.255 144.272,82.779 v1(144.399,82.779)
  Bottom Layer w0.4: v1(98.552,48.412) 108.128,48.412 v1(112.141,52.426) ; v1(112.141,64.11) 139.471,64.11 142.748,60.833 ; v1(120.167,85.649) 120.167,85.544 125.781,85.544 125.984,85.747 127.124,85.747 127.559,85.312 131.077,85.312 132.439,83.95 136.412,83.95 138.608,81.754 143.374,81.754 v1(144.399,82.779) ; v1(142.748,63.703) 142.748,60.833 ; SW2.5 154.762,52.578 155.016,52.832 155.016,58.293 154.432,58.877 143.815,58.877 142.748,59.944 142.748,60.833
TXD0: 2.36 P2.2 U4.4 | length 57.2
  Top Layer w0.4: v1(101.321,81.051) 101.321,76.532 102.616,75.237 2.36 ; U4.4 123.241,88.9 123.749,89.408 v1(124.003,89.967)
  Bottom Layer w0.4: v1(101.321,81.051) 101.825,81.556 101.825,90.856 102.232,91.262 110.719,91.262 112.471,93.015 117.17,93.015 118.11,92.075 120.244,92.075 122.394,89.925 v1@124.003,89.925 ; v1(124.003,89.967) v1@124.003,89.925 ; P2.2 130.683,89.027 129.785,89.925 v1@124.003,89.925
VIN: C4.1 D5.2 L1.1 P1.1 | length 82.6
  Top Layer w0.4: C4.1 126.095,82.561 126.095,84.287 v1(126.467,84.658) ; P1.1 167.386,54.381 168.808,54.381 169.342,53.848 169.342,48.906 L1.1
  Bottom Layer w0.4: v1(126.467,84.658) 129.981,84.658 131.343,83.296 132.625,83.296 134.821,81.1 148.262,81.1 148.336,81.026 148.336,79.248 D5.2 154.534,76.835 155.067,76.302 158.725,76.302 159.791,77.368 162.535,77.368 164.897,75.006 164.897,56.845 165.608,56.134 P1.1
"VIN FIL": C2.1 C3.1 D1.2 R1.1 U1.7 | length 72.5
  Top Layer w0.4: C2.1 130.607,56.947 130.607,72.136 130.999,72.528 C3.1 133.858,72.528 134.112,72.782 R1.1 ; D1.2 163.22,48.006 v1(163.22,50.571)
  Bottom Layer w0.4: C2.1 125.247,51.587 142.646,51.587 143.662,50.571 v1(163.22,50.571)
pads on no net: 2.4 2.5 2.14 2.16 2.17 2.18 2.19 2.20 2.21 2.22 2.23 2.24 2.26 2.27 2.28 2.29 2.30 2.31 2.32 2.33 2.34 CN3.HOLE H1.1 H2.1 H3.1 H4.1 S2.3 S2.4 U1.2 U1.3 U3.8
copper on no net:
  other v2: 87.546,47.388 89.746,47.388 175.43,47.388 177.63,47.388 85.996,48.938 91.296,48.938 173.88,48.938 179.18,48.938 85.996,51.138 91.296,51.138 173.88,51.138 179.18,51.138 87.546,52.688 89.746,52.688 175.43,52.688 177.63,52.688 175.43,88.917 177.63,88.917 87.546,88.981 89.746,88.981 173.88,90.467 179.18,90.467 85.996,90.531 91.296,90.531 173.88,92.667 179.18,92.667 85.996,92.731 91.296,92.731 175.43,94.217 177.63,94.217 87.546,94.281 89.746,94.281

## Polygon pours and split planes (outlines as drawn)
GND on Bottom Layer "GND_L02_P004" (solid, remove dead copper, pour order 4): 84.455,49.827 ccw(c88.582,49.832) 88.582,45.704 176.466,45.704 ccw(c176.466,49.832) 180.594,49.832 180.594,91.354 ccw(c176.466,91.361) 176.578,95.486 ccw(c176.467,95.426) 176.466,95.552 167.878,95.552 ccw(c166.179,95.052) 164.481,95.552 88.582,95.552 ccw(c88.582,91.425) 84.458,91.584 84.455,91.556
GND on Top Layer "GND_L01_P000" (solid, remove dead copper, pour order 0): 84.568,49.906 ccw(c88.695,49.911) 88.695,45.783 176.579,45.783 ccw(c176.579,49.911) 180.706,49.911 180.706,91.44 ccw(c176.579,91.44) 176.69,95.565 ccw(c176.579,95.504) 176.579,95.631 167.99,95.631 ccw(c166.292,95.131) 164.594,95.631 88.695,95.631 ccw(c88.695,91.504) 84.571,91.663 84.568,91.635

## Keep-outs
Top Layer:
  lines w0.254: 84.646,91.631 cw(c88.646,91.631) 88.646,95.631 164.643,95.631 cw(c166.243,95.258) 167.843,95.631 174.244,95.631 176.53,95.631 ; 84.646,91.762 84.646,50.038 ; 176.53,95.567 cw(c176.53,91.567) 180.53,91.567 180.53,50.038 cw(c176.53,50.038) 176.53,46.038 88.646,46.038 cw(c88.646,50.038) 84.646,50.038 ; 84.646,50.038 84.646,50.038 ; 84.646,50.038 84.646,50.038
Bottom Layer:
  lines w0.254: 84.646,91.631 cw(c88.646,91.631) 88.646,95.631 164.643,95.631 cw(c166.243,95.258) 167.843,95.631 174.244,95.631 176.53,95.631 ; 84.646,91.762 84.646,50.038 ccw(c88.646,50.038) 88.646,46.038 176.53,46.038 ccw(c176.53,50.038) 180.53,50.038 180.53,91.567 ccw(c176.53,91.567) 176.53,95.567 ; 177.673,92.71 180.848,89.535 180.848,52.451 178.562,50.165 178.562,47.752 176.784,45.974 86.614,45.974 84.582,48.006 84.582,91.44 88.138,94.996 178.435,94.996

## Other copper
Top Layer:
  pour cut-out: 100.508,92.071 100.513,92.075 100.711,92.075 100.711,88.519 100.667,88.563 100.508,88.563
Bottom Layer:
  pour cut-out: 159.893,94.107 163.449,94.107 163.449,90.678 160.02,90.678 159.893,90.805
  pour cut-out: 165.862,94.043 169.418,94.043 169.418,90.614 165.989,90.614 165.862,90.742

## Silkscreen, mask and mechanical layers (free items; w line width, h text height)
Top Overlay:
  drawing of 12 lines, arcs and shapes, not listed
  text "2352573" at 87.249,75.946 h1.52 r270
  text "CC02" at 177.546,59.309 h1.52 r90

## Text inside footprints (layer, text, board x,y; h text height)
2: Mechanical 13 "ANTENNA" at 89.504,81.517 h1.78
LED2: Top Overlay "R" at 155.448,46.228 h1.8; Top Overlay "B" at 147.955,46.228 h1.8